# EAGLE board BRD (EAGLE 9.7.0)

Size 228.61 x 47.15 mm. Coordinates in mm from the lower left corner, seen from the top.
Outline: 0,0 228.61,0 228.61,47.15 0,47.15 0,0
Copper layers (1*16): Top 0.035mm / dielectric 1.5mm / Bottom 0.035mm
Design rules "default": minimum track width 6mil, minimum drill 0.35mm, track to track 6mil, track to pad 6mil, pad to pad 6mil, via to via 6mil, smd to smd 6mil, copper to edge 40mil, drill to drill 6mil, minimum pad ring 10mil, minimum via ring 8mil, stop-mask expansion 4mil, vias tented up to drill 0mil, thermal gap 10mil

## Footprints (pad centres in the part's own frame; a part is rotated, then mirrored left to right if it is on the bottom)
LEDRD254W60D565H860B = drill 0.981 pad 1.581: 1 -1.27,0; 2 1.27,0
BATTERY-GENERIC = drill 1.118 pad 3.15 octagon: + 2.54,0; - -2.54,0
RESAD1016W63L850D250B = drill 0.83 pad 1.43: 1 -5.08,0; 2 5.08,0
SWITCH-SPDT-PTH-8.5X3.7MM = drill 1.016 pad 1.88: 1 -2.54,0; 2 0,0; 3 2.54,0
DIP762W53P254L1969H508Q14B = drill 0.743 pad 1.343: 1 -3.81,7.62; 2 -3.81,5.08; 3 -3.81,2.54; 4 -3.81,0; 5 -3.81,-2.54; 6 -3.81,-5.08; 7 -3.81,-7.62; 8 3.81,-7.62; 9 3.81,-5.08; 10 3.81,-2.54; 11 3.81,0; 12 3.81,2.54; 13 3.81,5.08; 14 3.81,7.62

## Placement (x,y rotation side)
D1  RED  [LEDRD254W60D565H860B]  63.08,22.94 0 top
D2  RED  [LEDRD254W60D565H860B]  80.86,22.94 0 top
D3  RED  [LEDRD254W60D565H860B]  98.64,22.94 0 top
D4  RED  [LEDRD254W60D565H860B]  222.55,31.28 0 top
P1  BATTERYGENERIC  [BATTERY-GENERIC]  8.26,8.26 180 top
R1  1k  [RESAD1016W63L850D250B]  64.35,38.18 90 top
R2  1k  [RESAD1016W63L850D250B]  82.13,38.18 90 top
R3  1k  [RESAD1016W63L850D250B]  99.91,38.18 90 top
R4  1k  [RESAD1016W63L850D250B]  215.04,20.37 0 top
S1  TOGGLE  [SWITCH-SPDT-PTH-8.5X3.7MM]  61.81,7.7 0 top
S2  TOGGLE  [SWITCH-SPDT-PTH-8.5X3.7MM]  79.59,7.7 0 top
S3  TOGGLE  [SWITCH-SPDT-PTH-8.5X3.7MM]  97.37,7.7 0 top
U1  74HC00_PDIP  [DIP762W53P254L1969H508Q14B]  138.11,28.11 90 top
U2  74HC08_PDIP  [DIP762W53P254L1969H508Q14B]  165.84,27.89 90 top
U3  74HC32_PDIP  [DIP762W53P254L1969H508Q14B]  194.19,28.73 90 top

## Library data of the parts
D1-D4 = Tinkercad; CATEGORY: Opto-Electronic; SUB-CATEGORY: LED; VALUE: LED_RED
P1 R1-R4 S1-S3 U1-U3 = Tinkercad

## Nets
D1_C: D1.2 R1.1
D2_C: D2.2 R2.1
D3_C: D3.2 R3.1
D4_A: D4.1 R4.2
P1+: P1.+ S1.1 S2.1 S3.1 U1.14 U2.14 U3.14
P1-: D4.2 P1.- R1.2 R2.2 R3.2 S1.3 S2.3 S3.3 U1.7 U1.12 U1.13 U2.7 U2.12 U2.13 U3.4 U3.5 U3.7 U3.9 U3.10
U1_1A: D1.1 S1.2 U1.1 U1.2 U2.9
U1_1Y: U1.3 U2.1
U1_2A: D2.1 S2.2 U1.4 U1.5 U3.12
U1_2Y: U1.6 U2.2
U1_3A: D3.1 S3.2 U1.9 U1.10 U2.5
U1_3Y: U1.8 U3.13
U2_1Y: U2.3 U2.4
U2_2Y: U2.6 U3.1
U2_3Y: U2.8 U3.2
U3_1Y: R4.1 U3.3
U3_4Y: U2.10 U3.11

## Tracks (layer width: path | path; a pad name or v marks a point on that pad's centre or on a via)
D1_C  (1 unrouted)
D2_C  (1 unrouted)
D3_C  (1 unrouted)
D4_A  (1 unrouted)
P1+  (6 unrouted)
P1-  (18 unrouted)
U1_1A  (4 unrouted)
U1_1Y  (1 unrouted)
U1_2A  (4 unrouted)
U1_2Y  (1 unrouted)
U1_3A  (4 unrouted)
U1_3Y  (1 unrouted)
U2_1Y  (1 unrouted)
U2_2Y  (1 unrouted)
U2_3Y  (1 unrouted)
U3_1Y  (1 unrouted)
U3_4Y  (1 unrouted)